# Altium PCB 0.PCB1.PcbDoc (part 12 of 12)
Units mm, origin at the board's own origin, x right, y up, seen from the top; angles counter-clockwise.
Board outline 77 x 72 mm, 6 copper layers (Top Layer, Layer 1, Layer 3, Layer 4, Layer 2, Bottom Layer), stack 1.538 mm thick; 570 components, 490 nets, 3331 pads, 1909 vias.
Unrouted connection lines stored in the file: 2.
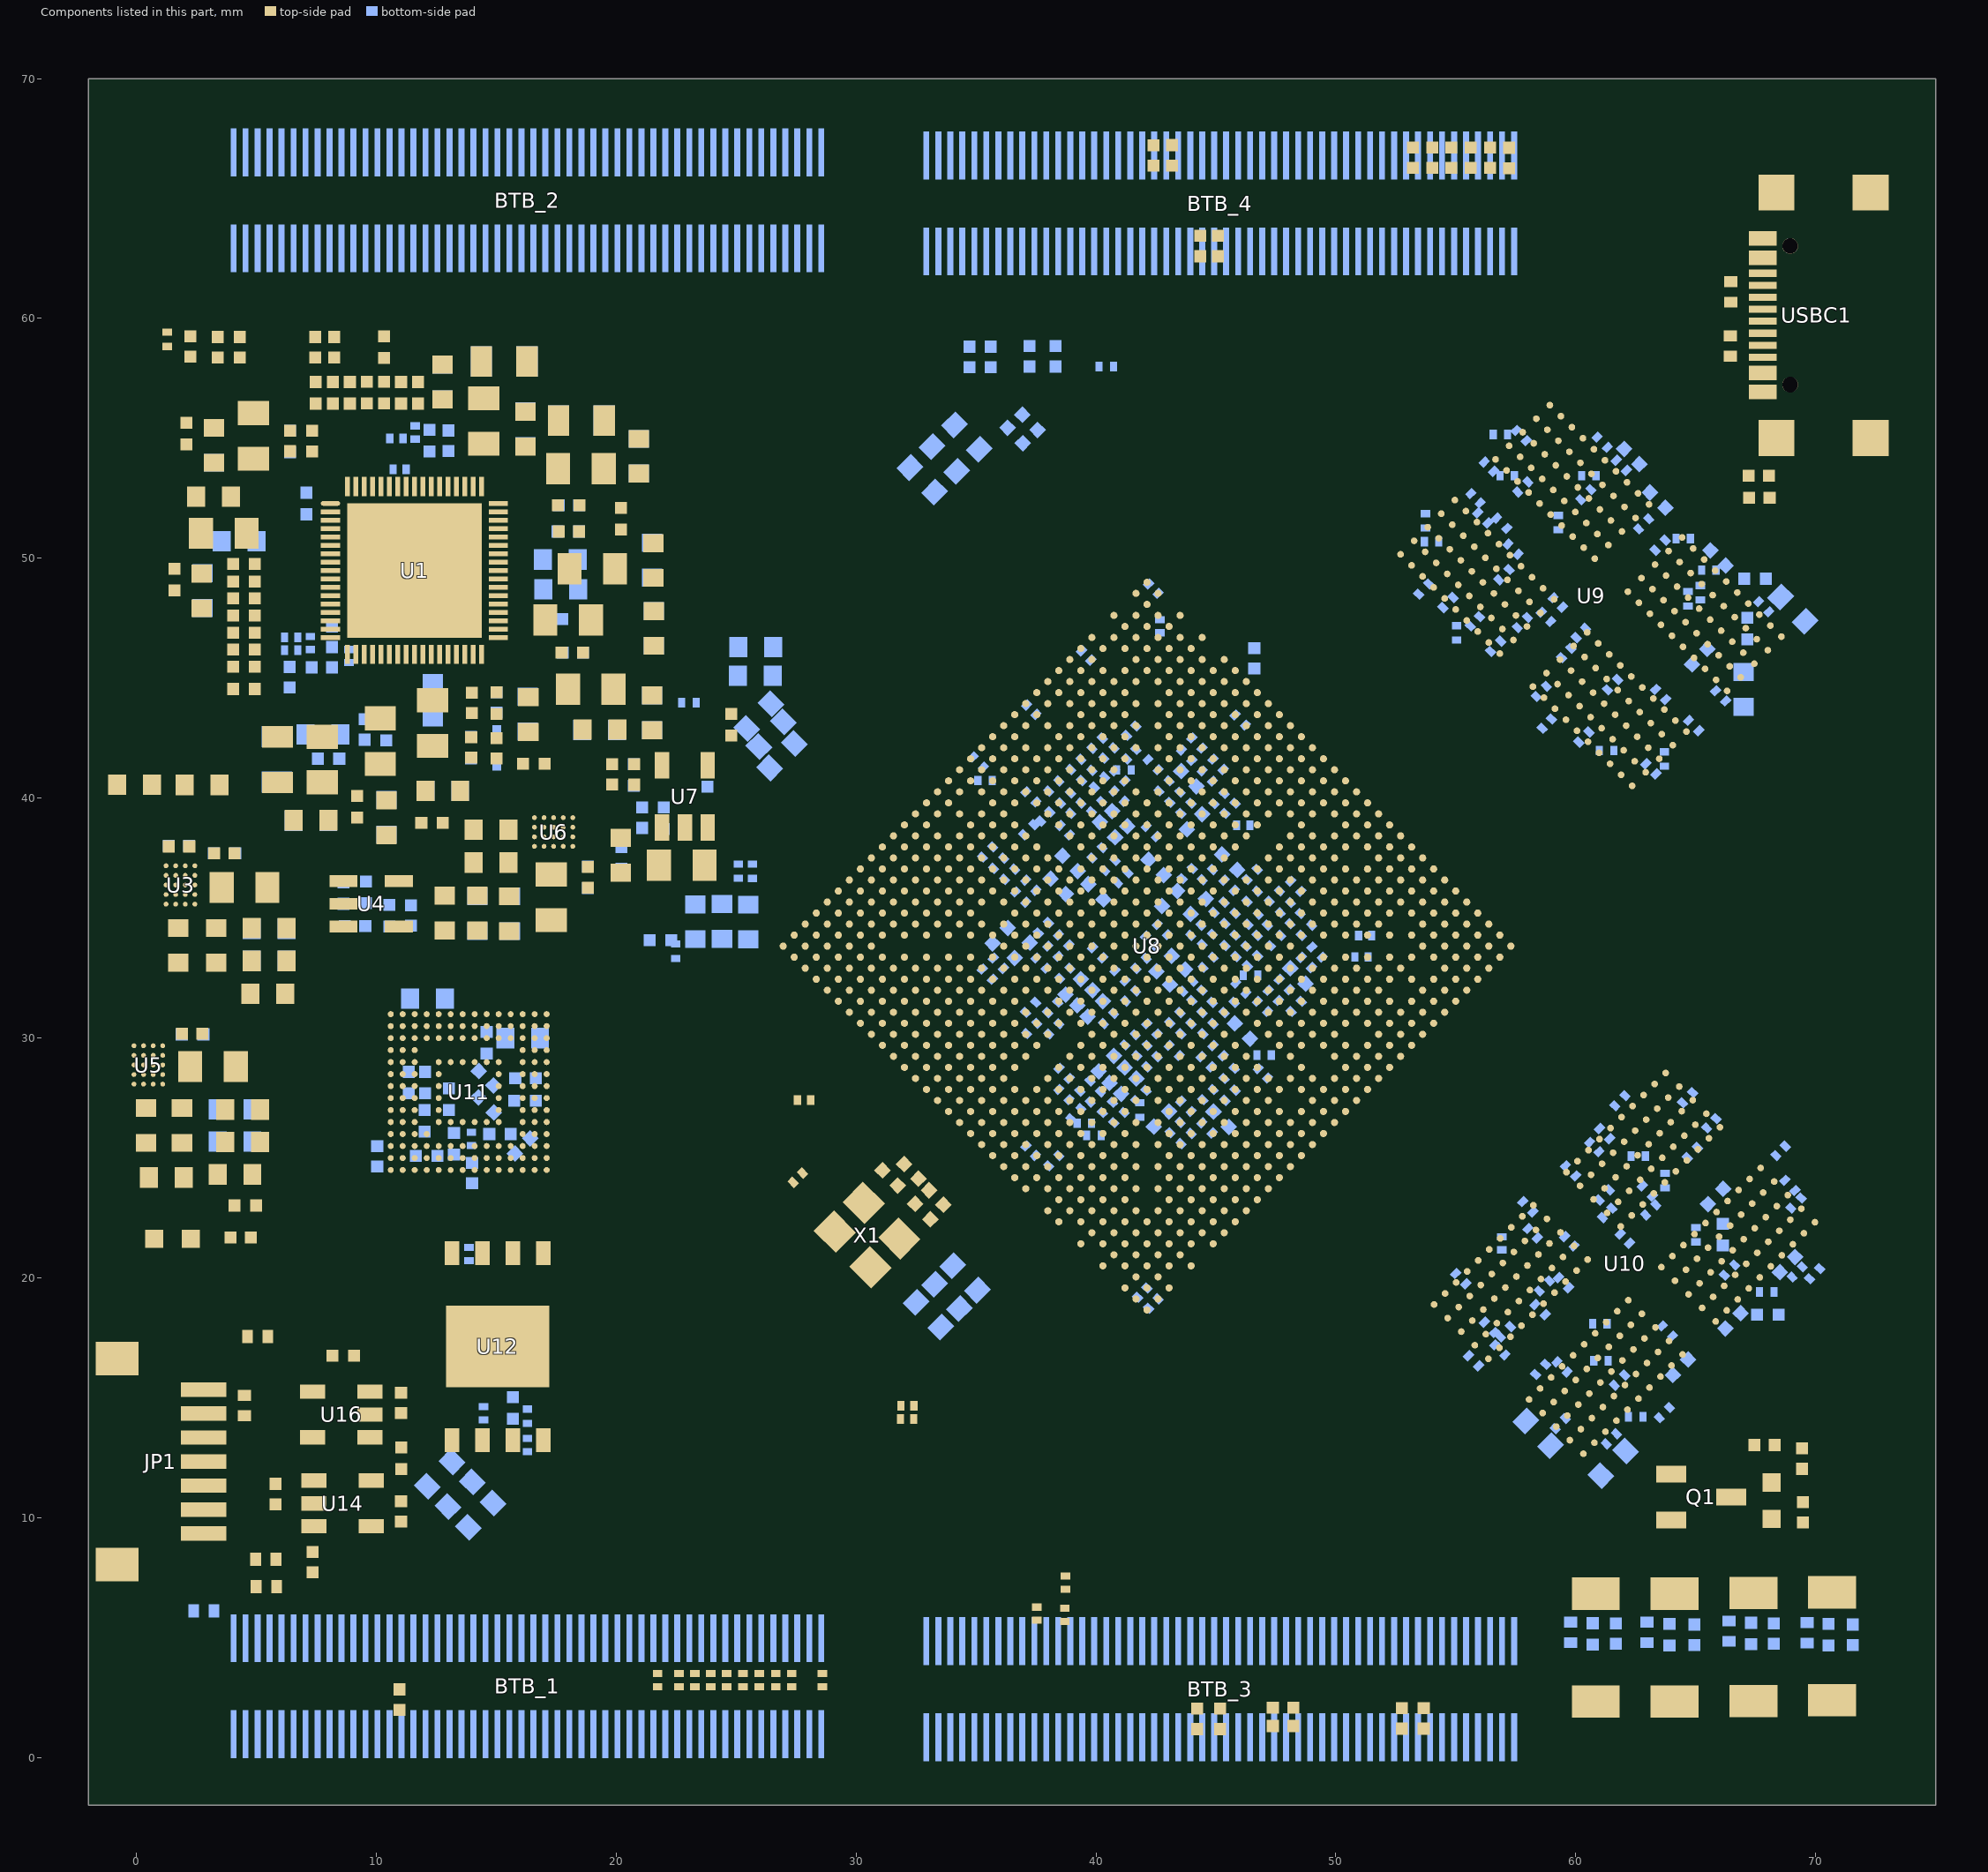
[diagram p16: the components of this part, seen from the top]

## Polygon pours and split planes (outlines as drawn) (continued)
VDD_VDENC_S0 on Layer 4 "VDD_VDENC_S0_L04_P176" (solid, remove dead copper, pour order 176): 20 vertices, not listed, extent 24.51,33.823 45.346,51.208
VCC1V8_PMU_DDR_S3 on Layer 4 "VCC1V8_PMU_DDR_S3_L04_P088" (solid, remove dead copper, pour order 88): 68.958,42.247 68.958,35.743 69.138,35.563 74.718,35.563 75,35.845 75,42.155
VCC1V8_PMU_DDR_S3 on Layer 4 "VCC1V8_PMU_DDR_S3_L04_P087" (solid, remove dead copper, pour order 87): -1.13,13.528 -0.648,13.528 0.662,12.218 68.704,12.218 72.173,15.687 72.173,37.59 75,37.59 75,6.658 68.732,0.389 -1.335,0.389
VDD2_DDR_S3 on Layer 4 "VDD2_DDR_S3_L04_P078" (solid, remove dead copper, pour order 78): 69.334,35.654 72.288,35.654 72.379,35.563 72.173,35.357 72.173,15.741 62.415,5.982 57.307,5.982 56.931,6.358 56.931,8.311 57.685,9.066 58.793,9.066 69.014,19.287 69.014,33.031 69.014,35.687
VDD_VDENC_S0 on Layer 4 "VDD_VDENC_S0_L04_P022" (solid, remove dead copper, pour order 22): 43.816,37.183 42.754,36.12 44.74,34.135 45.345,34.74 45.346,34.74 43.967,36.119 44.422,36.574 44.424,36.574
VDD_CPU_BIG0_S0 on Layer 4 "VDD_CPU_BIG0_S0_L04_P021" (solid, remove dead copper, pour order 21): 43.042,33.354 44.421,31.975 43.506,31.061 43.964,30.604 43.965,30.604 45.35,31.989 43.512,33.827
VCC_1V8_S0 on Layer 4 "VCC_1V8_S0_L04_P019" (solid, remove dead copper, pour order 19): 44.716,42.079 44.42,42.079 43.816,41.475 45.344,39.947 46.098,40.701
AVDD1V8_DDR_PLL_S0 on Layer 4 "AVDD1V8_DDR_PLL_S0_L04_P018" (solid, remove dead copper, pour order 18): 18 vertices, not listed, extent 44.418,26.46 47.186,31.069
VDD_LOGIC_S0 on Layer 4 "VDD_LOGIC_S0_L04_P012" (solid, remove dead copper, pour order 12): 21 vertices, not listed, extent 38.519,28.765 44.885,37.504
VDD2_DDR_S3 on Layer 4 "VDD2_DDR_S3_L04_P007" (solid, remove dead copper, pour order 7): 49.022,37.482 47.651,36.11 47.644,36.11 49.747,34.008 47.645,31.905 47.645,31.524 47.693,31.524 48.588,30.629 52.232,34.273
VDD_DDR_S0 on Layer 4 "VDD_DDR_S0_L04_P006" (solid, remove dead copper, pour order 6): 44.877,37.033 43.972,36.114 45.345,34.741 44.429,33.826 44.429,33.823 44.431,33.823 45.807,32.447 43.964,30.604 44.887,29.681 46.612,31.407 46.612,32.561 45.348,33.825 46.726,35.204
VDDQ_DDR on Layer 4 "VDDQ_DDR_L04_P004" (solid, remove dead copper, pour order 4): 21 vertices, not listed, extent 45.342,32.173 49.931,37.489
AVDD1V8_DDR_PLL_S0 on Layer 4 "AVDD1V8_DDR_PLL_S0_L04_P002" (solid, remove dead copper, pour order 2): 47.18,34.735 47.179,34.735 46.265,33.821 46.895,33.191 46.895,32.157 45.568,30.829 46.253,30.144 46.266,30.144 49.019,32.896
VCC1V8_PMU_DDR_S3 on Layer 4 "VCC1V8_PMU_DDR_S3_L04_P027" (solid, remove dead copper, pour order 27): 37.961,30.581 36.79,29.41 38.401,27.798 38.913,28.31 39.578,28.975
VCC_1V8_S0 on Layer 4 "VCC_1V8_S0_L04_P020" (solid, remove dead copper, pour order 20): 36.769,32.601 35.739,32.601 35.739,32.061 37.523,30.277 38.308,31.062
AVDD1V8_DDR_PLL_S0 on Layer 4 "AVDD1V8_DDR_PLL_S0_L04_P017" (solid, remove dead copper, pour order 17): 17 vertices, not listed, extent 40.289,26.007 44.932,28.31
VDD_CPU_BIG1_S0 on Layer 4 "VDD_CPU_BIG1_S0_L04_P016" (solid, remove dead copper, pour order 16): 41.358,29.835 43.039,28.154 43.04,27.837 42.426,27.223 40.587,29.062
VDD_LOGIC_S0 on Layer 4 "VDD_LOGIC_S0_L04_P032" (solid, remove dead copper, pour order 32): 23.118,54.544 21.77,54.544 19.496,56.818 15.519,56.818 14.889,56.188 13.916,56.188 13.583,56.52 13.591,56.528 13.591,59.807 14.17,60.386 23.388,60.386 25.252,58.522 25.252,54.493
VDD_VDENC_S0 on Layer 3 "VDD_VDENC_S0_L03_P047" (solid, remove dead copper, pour order 47): 26.979,49.574 24.262,52.29 0.058,52.29 0.058,40.348 0.291,40.115 2.052,40.115 2.285,40.348 2.189,40.445 2.189,47.723 4.039,49.574
VDDQ_DDR on Layer 3 "VDDQ_DDR_L03_P182" (solid, remove dead copper, pour order 182): 25 vertices, not listed, extent -1.512,34.016 54.736,69.502
VDD_NPU_S0 on Layer 3 "VDD_NPU_S0_L03_P092" (solid, remove dead copper, pour order 92): 13.65,32.464 37.556,32.464 38.911,33.818 38.911,34.818 38.07,35.659 37.2,35.659 34.439,38.42 23.794,38.42 21.81,36.437 18.477,36.437 17.83,37.083 13.275,37.083 11.978,35.786 11.978,33.998
VDDQ_DDR on Layer 3 "VDDQ_DDR_L03_P066" (solid, remove dead copper, pour order 66): 51 vertices, not listed, extent 51.98,-1.549 74.782,31.12
VDD_GPU_S0 on Layer 3 "VDD_GPU_S0_L03_P178" (solid, remove dead copper, pour order 178): 19 vertices, not listed, extent 18.774,36.632 50.228,59.568
VDD2_DDR_S3 on Layer 3 "VDD2_DDR_S3_L03_P037" (solid, remove dead copper, pour order 37): 39 vertices, not listed, extent 1.396,8.629 52.512,45.098
VDD_CPU_BIG0_S0 on Layer 3 "VDD_CPU_BIG0_S0_L03_P069" (solid, remove dead copper, pour order 69): 38 vertices, not listed, extent -1.355,4.646 54.498,38.189
VCC1V8_PMU_DDR_S3 on Layer 3 "VCC1V8_PMU_DDR_S3_L03_P033" (solid, remove dead copper, pour order 33): 22 vertices, not listed, extent 5.935,22.615 40.751,42.761
VDD_DDR_S0 on Layer 3 "VDD_DDR_S0_L03_P070" (solid, remove dead copper, pour order 70): 23 vertices, not listed, extent -1.55,-1.234 58.335,38.555
VDDQ_DDR on Layer 3 "VDDQ_DDR_L03_P061" (solid, remove dead copper, pour order 61): 80 vertices, not listed, extent 50.728,40.069 74.779,69.513
VCC1V8_PMU_DDR_S3 on Layer 3 "VCC1V8_PMU_DDR_S3_L03_P059" (solid, remove dead copper, pour order 59): 84 vertices, not listed, extent 54.007,41.413 67.873,54.727
VDD_DDR_S0 on Layer 3 "VDD_DDR_S0_L03_P067" (solid, remove dead copper, pour order 67): 18 vertices, not listed, extent 44.882,32.368 55.577,38.752
VDD_CPU_BIG0_S0 on Layer 3 "VDD_CPU_BIG0_S0_L03_P068" (solid, remove dead copper, pour order 68): 42.035,32.346 46.634,27.747 54.505,27.747 54.505,32.5 45.752,32.5 43.97,34.282
VDD_CPU_BIG1_S0 on Layer 3 "VDD_CPU_BIG1_S0_L03_P035" (solid, remove dead copper, pour order 35): 18 vertices, not listed, extent 3.896,17.326 46.251,30.603
VDD_GPU_S0 on Layer 3 "VDD_GPU_S0_L03_P186" (solid, remove dead copper, pour order 186): 17.914,59.561 17.914,55.517 18.153,55.278 20.553,55.278 20.931,55.657 20.931,59.586
VCC1V8_PMU_DDR_S3 on Layer 3 "VCC1V8_PMU_DDR_S3_L03_P063" (solid, remove dead copper, pour order 63): 119 vertices, not listed, extent 52.694,12.822 69.321,27.521
AVDD1V8_DDR_PLL_S0 on Layer 3 "AVDD1V8_DDR_PLL_S0_L03_P026" (solid, remove dead copper, pour order 26): 40.777,41.121 38.265,38.609 37.161,38.609 37.027,38.475 37.072,38.43 37.072,37.496 38.907,37.496 41.556,40.145 41.678,40.145
VDD2_DDR_S3 on Layer 3 "VDD2_DDR_S3_L03_P054" (solid, remove dead copper, pour order 54): 37 vertices, not listed, extent 57.338,15.398 67.231,24.892
VDD2_DDR_S3 on Layer 3 "VDD2_DDR_S3_L03_P055" (solid, remove dead copper, pour order 55): 26 vertices, not listed, extent 54.774,42.756 66.951,53.19
VCC1V8_PMU_DDR_S3 on Layer 3 "VCC1V8_PMU_DDR_S3_L03_P085" (solid, remove dead copper, pour order 85): 31 vertices, not listed, extent 58.191,23.027 72.989,44.423
VDD2_DDR_S3 on Layer 3 "VDD2_DDR_S3_L03_P072" (solid, remove dead copper, pour order 72): 23 vertices, not listed, extent 54.729,23.239 61.897,46.599
VDD_DDR_S0 on Layer 3 "VDD_DDR_S0_L03_P184" (solid, remove dead copper, pour order 184): 46.819,32.388 46.893,32.388 47.142,32.637 48.676,32.637 49.092,33.053 49.064,33.081 49.064,33.328 47.35,33.328 46.999,32.977 46.509,32.977
VDD_CPU_BIG0_S0 on Layer 3 "VDD_CPU_BIG0_S0_L03_P183" (solid, remove dead copper, pour order 183): 45.359,32.479 45.404,32.434 45.658,32.434 45.752,32.34 45.752,31.758 45.653,31.659 45.153,31.659 45.026,31.786 45.026,32.383
VDD_NPU_S0 on Layer 3 "VDD_NPU_S0_L03_P181" (solid, remove dead copper, pour order 181): 36.156,36.46 36.446,36.17 36.784,36.17 37.304,35.649 37.304,34.882 36.152,34.882
no net on Layer 3 "NONET_L03_P034" (solid, remove dead copper, pour order 34): 39.832,29.229 38.505,30.557 37.937,30.557 36.79,29.41 38.661,27.539 38.8,27.539
VDDQ_DDR on Layer 3 "VDDQ_DDR_L03_P086" (solid, remove dead copper, pour order 86): 68.927,40.069 72.989,36.007 72.971,35.99 72.971,30.661 73.885,29.746 74.782,29.746 74.782,40.283 72.991,42.035
VDD2_DDR_S3 on Layer 3 "VDD2_DDR_S3_L03_P084" (solid, remove dead copper, pour order 84): 71.168,33.551 70.667,33.051 60.987,33.051 60.421,33.617 60.421,35.187 61.203,35.969 61.414,35.758 71.264,35.758
VCC1V8_PMU_DDR_S3 on Layer 3 "VCC1V8_PMU_DDR_S3_L03_P065" (solid, remove dead copper, pour order 65): 40 vertices, not listed, extent 52.346,51.278 58.348,56.985
VDD2_DDR_S3 on Layer 3 "VDD2_DDR_S3_L03_P064" (solid, remove dead copper, pour order 64): 55.862,53.033 55.851,53.043 55.188,53.043 54.033,51.887 53.72,51.887 53.542,52.065 53.542,53.025 56.09,55.573 56.59,55.573 56.855,55.309 56.85,55.304 56.85,54.935 56.171,54.257 56.171,53.706 56.171,53.295
no net on Bottom Layer "NONET_L06_P195" (solid, remove dead copper, pour order 195): 24.459,10.521 24.459,5.974 24.858,5.576 25.509,5.576 25.509,10.054 25.021,10.541
GND on Bottom Layer "GND_L06_P194" (solid, remove dead copper, pour order 194): -2,70 75,70 75,-2.001 -1.992,-2.001 -1.997,-1.996
VDD_CPU_LIT_S0 on Bottom Layer "VDD_CPU_LIT_S0_L06_P179" (solid, remove dead copper, pour order 179): 29 vertices, not listed, extent 19.181,30.397 29.341,45.215
VCC_1V1_NLDO_S3 on Bottom Layer "VCC_1V1_NLDO_S3_L06_P090" (solid, remove dead copper, pour order 90): 32 vertices, not listed, extent 4.756,36.058 23.182,49.768
VCC_2V0_PLDO_S3 on Bottom Layer "VCC_2V0_PLDO_S3_L06_P089" (solid, remove dead copper, pour order 89): 25 vertices, not listed, extent 9.567,46.076 22.414,56.8
VCC4V0_SYS on Bottom Layer "VCC4V0_SYS_L06_P141" (solid, remove dead copper, pour order 141): 8.699,41.392 8.699,41.41 9.062,41.773 9.006,41.829 9.006,44.082 8.849,44.24 8.823,44.214 8.115,44.214 8.115,44.212 7.749,43.846 7.749,41.684 8.028,41.405
GND on Bottom Layer "GND_L06_P163" (solid, remove dead copper, pour order 163): 17 vertices, not listed, extent 21.612,33.795 26.215,36.945
GND on Bottom Layer "GND_L06_P157" (solid, remove dead copper, pour order 157): 35.105,20.064 34.907,20.064 32.849,18.006 32.849,17.775 33.421,17.204 33.728,17.204 35.879,19.355
VDD_CPU_BIG1_S0 on Bottom Layer "VDD_CPU_BIG1_S0_L06_P156" (solid, remove dead copper, pour order 156): 34.068,21.067 33.753,21.067 31.709,19.022 31.709,18.702 32.278,18.133 32.28,18.136 32.57,18.136 34.884,20.45 34.261,21.072 34.063,21.072
VDD_NPU_S0 on Bottom Layer "VDD_NPU_S0_L06_P149" (solid, remove dead copper, pour order 149): 22.877,34.506 22.905,34.506 23.027,34.628 25.981,34.628 26.202,34.407 26.202,33.594 25.981,33.373 22.895,33.373 22.895,33.45 22.875,33.47
VCC1V8_PMU_DDR_S3 on Bottom Layer "VCC1V8_PMU_DDR_S3_L06_P077" (solid, remove dead copper, pour order 77): 19 vertices, not listed, extent -1.41,6.559 10.228,33.5
VDD_CPU_BIG0_S0 on Bottom Layer "VDD_CPU_BIG0_S0_L06_P075" (solid, remove dead copper, pour order 75): -0.971,35.355 -0.681,35.644 3.586,35.644 4.968,37.026 5.534,37.026 7.106,35.454 7.106,31.471 6.761,31.126 -1.045,31.126
VCC1V8_PMU_DDR_S3 on Bottom Layer "VCC1V8_PMU_DDR_S3_L06_P154" (solid, remove dead copper, pour order 154): 9.86,41.984 9.669,41.794 9.672,41.791 9.672,41.27 9.578,41.27 8.938,40.63 8.965,40.602 8.965,39.67 9.199,39.436 10.985,39.436 11.13,39.581 11.13,42.017
VCC4V0_SYS on Bottom Layer "VCC4V0_SYS_L06_P091" (solid, remove dead copper, pour order 91): 4.099,3.866 4.188,3.955 6.377,3.955 6.423,3.909 6.4,3.887 6.4,2.159 6.281,2.04 4.132,2.04 4.132,2.045 4.096,2.081
GND on Bottom Layer "GND_L06_P143" (solid, remove dead copper, pour order 143): 18.023,50.361 18.336,50.673 19.324,50.673 19.677,50.32 19.677,48.118 19.59,48.032 18.049,48.032
GND on Bottom Layer "GND_L06_P165" (solid, remove dead copper, pour order 165): 13.474,37.412 13.096,37.412 12.209,36.526 12.209,35.535 12.361,35.383 16.055,35.383 16.276,35.604 16.276,37.442
VDD_VDENC_S0 on Bottom Layer "VDD_VDENC_S0_L06_P048" (solid, remove dead copper, pour order 48): 0.063,41.628 0.074,41.64 8.474,41.64 8.874,41.24 8.874,38.369 8.7,38.195 8.684,38.212 3.151,38.212 2.776,38.588 2.776,39.297 0.175,39.297 0.048,39.424
GND on Bottom Layer "GND_L06_P171" (solid, remove dead copper, pour order 171): 21.165,46.719 21.168,46.721 24.609,46.721 24.609,46.617 25.1,46.127 25.1,43.389 24.914,43.203 24.879,43.239 23.357,43.239 23.357,43.381 23.121,43.617 23.121,45.375 23.07,45.375 22.582,45.863 21.152,45.863
VDDQ_DDR on Bottom Layer "VDDQ_DDR_L06_P155" (solid, remove dead copper, pour order 155): 5.138,56.388 5.587,56.388 6.283,55.692 6.682,55.692 6.682,55.677 6.753,55.606 6.753,54.933 6.646,54.826 5.206,54.826 4.978,55.055 4.978,56.383
VDD_LOGIC_S0 on Bottom Layer "VDD_LOGIC_S0_L06_P146" (solid, remove dead copper, pour order 146): 12.344,56.993 12.344,56.577 11.864,56.097 11.874,56.087 11.874,55.111 11.983,55.002 13.352,55.002 13.469,55.118 13.469,56.82 13.286,57.003
VDD_GPU_S0 on Bottom Layer "VDD_GPU_S0_L06_P148" (solid, remove dead copper, pour order 148): 19.077,56.365 18.935,56.365 18.813,56.244 18.864,56.193 18.864,54.58 19.265,54.179 21.353,54.179 21.569,54.394 21.569,55.268 21.554,55.283 21.551,55.281 19.849,55.281 19.849,55.377 19.722,55.504 19.722,56.358
GND on Bottom Layer "GND_L06_P166" (solid, remove dead copper, pour order 166): 5.214,43.018 5.214,42.154 5.26,42.108 6.603,42.108 7.332,41.379 7.815,41.379 7.815,41.837 7.84,41.862 7.736,41.966 7.736,43 7.502,43.234 5.272,43.234
VDD_NPU_S0 on Bottom Layer "VDD_NPU_S0_L06_P164" (solid, remove dead copper, pour order 164): 12.323,34.956 12.191,34.824 12.191,33.988 12.402,33.777 15.943,33.777 16.133,33.968 16.133,34.984
GND on Bottom Layer "GND_L06_P162" (solid, remove dead copper, pour order 162): 1.899,15.604 1.899,15.571 1.79,15.461 1.79,14.011 1.897,13.904 3.769,13.904 3.941,14.077 3.941,15.601
VCC4V0_SYS on Bottom Layer "VCC4V0_SYS_L06_P161" (solid, remove dead copper, pour order 161): 1.843,13.541 1.843,12.053 1.978,11.918 3.746,11.918 3.987,12.159 3.987,13.556
GND on Bottom Layer "GND_L06_P160" (solid, remove dead copper, pour order 160): 8.391,35.84 8.391,35.355 8.808,34.938 9.181,34.938 9.181,34.458 9.237,34.402 9.829,34.402 9.872,34.445 9.872,35.134 9.989,35.25 10.815,35.25 10.898,35.334 10.898,35.865
GND on Bottom Layer "GND_L06_P159" (solid, remove dead copper, pour order 159): 3.022,27.44 3.022,25.268 3.063,25.228 3.819,25.228 3.934,25.342 3.934,27.427
VDD_CPU_BIG1_S0 on Bottom Layer "VDD_CPU_BIG1_S0_L06_P153" (solid, remove dead copper, pour order 153): 4.487,27.531 4.487,27.526 4.3,27.338 4.3,23.77 4.406,23.663 5.547,23.663 5.704,23.82 5.679,23.846 5.679,27.524
GND on Bottom Layer "GND_L06_P152" (solid, remove dead copper, pour order 152): 12.087,11.855 14.399,9.543 14.399,9.523 14.35,9.523 13.855,9.028 11.559,11.324 11.559,11.331
VDD_CPU_BIG0_S0 on Bottom Layer "VDD_CPU_BIG0_S0_L06_P151" (solid, remove dead copper, pour order 151): 13.103,12.898 13.103,12.891 15.392,10.602 14.876,10.087 14.858,10.087 14.858,10.097 12.588,12.368
VDD_LOGIC_S0 on Bottom Layer "VDD_LOGIC_S0_L06_P147" (solid, remove dead copper, pour order 147): 13.957,58.837 13.936,58.817 13.936,56.553 14.282,56.208 14.36,56.287 15.135,56.287 15.298,56.449 15.298,58.839
VCC4V0_SYS on Bottom Layer "VCC4V0_SYS_L06_P144" (solid, remove dead copper, pour order 144): 4.642,51.131 5.854,51.131 6.088,50.897 6.088,50.249 5.986,50.148 4.66,50.148
VCC4V0_SYS on Bottom Layer "VCC4V0_SYS_L06_P142" (solid, remove dead copper, pour order 142): 16.583,48.276 16.585,48.273 17.373,48.273 17.657,48.558 17.64,48.575 17.64,50.605 17.513,50.732 16.654,50.732 16.54,50.617
GND on Top Layer "GND_L01_P192" (solid, remove dead copper, pour order 192): -2,70 75,70 75,-2 -2,-2
GND on Top Layer "GND_L01_P174" (solid, remove dead copper, pour order 174): 17 vertices, not listed, extent 1.307,45.057 4.587,50.066
NetL2_1 on Top Layer "NETL2_1_L01_P098" (solid, remove dead copper, pour order 98): 18 vertices, not listed, extent 14.681,51.839 18.341,54.367
NetL4_1 on Top Layer "NETL4_1_L01_P102" (solid, remove dead copper, pour order 102): 14.686,47.14 14.691,47.135 15.531,47.135 17.482,45.184 17.485,45.187 18.501,45.187 18.501,43.894 18.488,43.881 17.401,43.881 14.683,46.599
GND on Top Layer "GND_L01_P169" (solid, remove dead copper, pour order 169): 15.867,43.475 15.867,43.434 15.702,43.269 15.712,43.259 15.712,42.144 15.945,41.91 18.849,41.91 19.11,42.172 19.098,42.185 19.098,43.32 19.011,43.32 18.785,43.546
GND on Top Layer "GND_L01_P127" (solid, remove dead copper, pour order 127): 1.089,33.434 1.089,33.45 1.287,33.648 3.977,33.648 4.305,33.32 4.305,32.525 4.355,32.474 5.28,32.474 5.364,32.39 5.364,31.382 5.252,31.27 5.239,31.283 1.373,31.283 1.373,31.288 1.117,31.545
GND on Top Layer "GND_L01_P173" (solid, remove dead copper, pour order 173): 2.059,52.144 3.149,52.144 3.428,52.423 3.428,53.01 3.792,53.01 4.162,53.381 4.162,54.547 3.946,54.763 2.806,54.763 2.367,55.202 1.866,55.202 1.803,55.139 1.803,54.394 2.044,54.153 2.044,52.152
VDD_NPU_S0 on Top Layer "VDD_NPU_S0_L01_P133" (solid, remove dead copper, pour order 133): 18.734,38.138 19.087,37.785 19.087,36.736 19.024,36.673 18.602,36.673 18.526,36.749 18.526,37.422 18.038,37.91 18.038,38.138
NetL13_1 on Top Layer "NETL13_1_L01_P130" (solid, remove dead copper, pour order 130): 16.522,38.492 16.461,38.431 16.461,36.307 16.616,36.152 17.998,36.152 18.12,36.274 18.12,37.351 17.871,37.6 17.307,37.6 17.307,37.641 17.18,37.768 17.18,38.497
VDD_DDR_S0 on Top Layer "VDD_DDR_S0_L01_P114" (solid, remove dead copper, pour order 114): 18 vertices, not listed, extent 18.203,48.806 21.965,51.451
GND on Top Layer "GND_L01_P131" (solid, remove dead copper, pour order 131): 26 vertices, not listed, extent 17.147,36.757 18.526,39.368
VDD_NPU_S0 on Top Layer "VDD_NPU_S0_L01_P124" (solid, remove dead copper, pour order 124): 18.549,36.561 18.536,36.561 17.386,35.41 17.378,35.418 16.316,35.418 15.958,35.06 12.448,35.06 12.27,34.882 12.27,34.024 12.44,33.853 17.932,33.853 19.204,35.126 19.204,36.543
GND on Top Layer "GND_L01_P170" (solid, remove dead copper, pour order 170): 22 vertices, not listed, extent 4.52,38.634 6.954,42.987
GND on Top Layer "GND_L01_P168" (solid, remove dead copper, pour order 168): 15.818,58.827 15.841,58.85 16.723,58.85 16.723,58.829 18.457,57.094 18.457,55.24 18.305,55.088 16.42,55.088 15.755,55.753 15.785,55.784 15.785,58.85
VDD2_DDR_S3 on Top Layer "VDD2_DDR_S3_L01_P082" (solid, remove dead copper, pour order 82): 17 vertices, not listed, extent 31.432,-1.742 59.806,10.849
GND on Top Layer "GND_L01_P189" (solid, remove dead copper, pour order 189): 163 vertices, not listed, extent 50.863,37.962 63.707,52.282
GND on Top Layer "GND_L01_P191" (solid, remove dead copper, pour order 191): 192 vertices, not listed, extent 51.055,17.46 65.165,29.632
VDD_GPU_S0 on Top Layer "VDD_GPU_S0_L01_P113" (solid, remove dead copper, pour order 113): 26 vertices, not listed, extent 18.229,51.964 21.381,56.378
NetL14_1 on Top Layer "NETL14_1_L01_P145" (solid, remove dead copper, pour order 145): 23.499,39.309 23.179,38.989 23.179,36.373 23.306,36.246 24.416,36.246 24.528,36.358 24.495,36.391 24.495,39.314
VDD_VDENC_S0 on Top Layer "VDD_VDENC_S0_L01_P119" (solid, remove dead copper, pour order 119): 5.239,41.105 5.719,41.585 8.536,41.585 8.691,41.43 8.691,38.674 8.574,38.558 7.604,38.558 7.322,38.839 7.322,39.65 7.213,39.759 5.242,39.759
GND on Top Layer "GND_L01_P175" (solid, remove dead copper, pour order 175): 8.793,39.454 11.206,39.454 11.358,39.302 11.358,37.9 11.203,37.745 9.524,37.745 9.524,37.752 8.78,38.497
VDD2_DDR_S3 on Top Layer "VDD2_DDR_S3_L01_P117" (solid, remove dead copper, pour order 117): 26 vertices, not listed, extent 11.399,38.207 14.282,46.391
GND on Top Layer "GND_L01_P172" (solid, remove dead copper, pour order 172): 13.101,40.722 13.865,40.722 14.505,41.362 15.572,41.362 15.75,41.184 15.727,41.161 15.727,40.734 14.818,39.825 13.106,39.825
VCC4V0_SYS on Top Layer "VCC4V0_SYS_L01_P125" (solid, remove dead copper, pour order 125): 1.178,36.081 1.767,36.081 1.838,36.01 1.838,35.4 1.998,35.24 3.781,35.24 4.018,35.004 4.018,34.008 3.842,33.833 1.252,33.833 1.003,34.082 1.003,35.954
NetL5_1 on Top Layer "NETL5_1_L01_P139" (solid, remove dead copper, pour order 139): 4.236,54.656 5.539,54.656 5.539,53.665 5.732,53.472 8.8,53.472 8.897,53.376 8.887,53.366 8.887,52.596 8.709,52.596 8.699,52.586 8.513,52.771 4.935,52.771 4.236,53.47
VCC_3V3_S3 on Top Layer "VCC_3V3_S3_L01_P138" (solid, remove dead copper, pour order 138): 3.187,51.689 3.644,51.232 3.644,49.19 3.446,48.992 1.584,48.992 1.584,49.05 1.33,49.304 1.338,49.312 1.338,50.833 2.194,51.689
VDD_CPU_BIG1_S0 on Top Layer "VDD_CPU_BIG1_S0_L01_P137" (solid, remove dead copper, pour order 137): 23 vertices, not listed, extent 2.43,22.771 5.737,30.491
GND on Top Layer "GND_L01_P136" (solid, remove dead copper, pour order 136): 21 vertices, not listed, extent -1.436,24.941 1.274,29.396
NetL12_1 on Top Layer "NETL12_1_L01_P135" (solid, remove dead copper, pour order 135): 0.589,28.565 0.695,28.672 0.954,28.672 1.747,29.464 2.748,29.464 2.748,29.462 2.948,29.261 2.948,28.105 2.77,27.928 0.675,27.928 0.566,28.037
VCC4V0_SYS on Top Layer "VCC4V0_SYS_L01_P134" (solid, remove dead copper, pour order 134): -0.229,28.499 -0.229,28.542 -0.163,28.608 -0.161,28.606 0.441,28.606 0.54,28.507 0.54,27.699 0.599,27.699 0.675,27.623 2.316,27.623 2.463,27.476 2.463,26.612 2.283,26.432 -0.069,26.432 -0.224,26.587
VDD_CPU_BIG0_S0 on Top Layer "VDD_CPU_BIG0_S0_L01_P132" (solid, remove dead copper, pour order 132): 2.326,37.102 2.369,37.059 3.093,37.059 3.497,37.463 3.497,37.948 3.002,37.948 2.994,37.956 2.323,37.285 2.323,37.125
GND on Top Layer "GND_L01_P129" (solid, remove dead copper, pour order 129): 18 vertices, not listed, extent 0.413,35.771 2.522,36.884
NetL11_1 on Top Layer "NETL11_1_L01_P128" (solid, remove dead copper, pour order 128): 1.935,35.547 1.993,35.489 3.924,35.489 4.061,35.626 4.061,36.973 3.835,37.199 2.963,37.199 2.636,36.871 2.636,36.198 2.577,36.139 1.918,36.139
VDD_CPU_BIG0_S0 on Top Layer "VDD_CPU_BIG0_S0_L01_P126" (solid, remove dead copper, pour order 126): 3.842,37.961 5.42,37.961 6.718,36.663 6.718,31.443 6.654,31.38 5.648,31.38 5.493,31.534 5.501,31.542 5.501,35.103 4.759,35.845 4.759,37.056 4.34,37.476 3.84,37.476
GND on Top Layer "GND_L01_P123" (solid, remove dead copper, pour order 123): 13.698,39.073 13.698,38.301 12.214,36.818 12.214,35.548 12.422,35.339 15.94,35.339 16.189,35.588 16.189,36.353 15.95,36.592 14.818,36.592 14.66,36.749 14.696,36.785 14.696,39.083
VCC4V0_SYS on Top Layer "VCC4V0_SYS_L01_P122" (solid, remove dead copper, pour order 122): 15.135,39.106 15.514,39.485 17.073,39.485 17.205,39.353 17.205,38.573 17.132,38.499 16.497,38.499 16.271,38.273 16.271,36.876 16.08,36.686 14.968,36.686 14.807,36.846 14.807,38.842
VCC_1V1_NLDO_S3 on Top Layer "VCC_1V1_NLDO_S3_L01_P121" (solid, remove dead copper, pour order 121): 17 vertices, not listed, extent 19.656,36.185 22.298,40.818
VDDQ_DDR on Top Layer "VDDQ_DDR_L01_P120" (solid, remove dead copper, pour order 120): 29 vertices, not listed, extent 1.82,52.586 9.25,56.63
VCC1V8_PMU_DDR_S3 on Top Layer "VCC1V8_PMU_DDR_S3_L01_P118" (solid, remove dead copper, pour order 118): 8.836,42.074 8.836,39.774 9.156,39.454 11.028,39.454 11.378,39.805 11.378,41.974 11.069,42.284 9.046,42.284
VDD_CPU_LIT_S0 on Top Layer "VDD_CPU_LIT_S0_L01_P116" (solid, remove dead copper, pour order 116): 17 vertices, not listed, extent 18.376,42.439 21.919,46.317
VDD_LOGIC_S0 on Top Layer "VDD_LOGIC_S0_L01_P112" (solid, remove dead copper, pour order 112): 12.331,57 12.892,57 13.939,58.047 13.939,58.832 14.828,58.832 15.133,58.527 15.133,56.172 15.138,56.167 13.268,56.167 13.179,56.256 12.328,56.256
VCC4V0_SYS on Top Layer "VCC4V0_SYS_L01_P111" (solid, remove dead copper, pour order 111): 8.485,52.398 8.483,52.398 8.036,52.845 4.457,52.845 4.457,52.85 4.327,52.98 3.571,52.98 3.571,52.134 3.576,52.129 3.583,52.136 7.401,52.136 7.454,52.19 8.491,52.19
NetL7_1 on Top Layer "NETL7_1_L01_P110" (solid, remove dead copper, pour order 110): 8.491,50.635 7.292,50.635 6.227,51.7 6.222,51.694 4.089,51.694 4.089,50.399 4.091,50.402 5.349,50.402 5.613,50.666 6.563,50.666 6.809,50.419 6.827,50.437 8.496,50.437
VCC4V0_SYS on Top Layer "VCC4V0_SYS_L01_P109" (solid, remove dead copper, pour order 109): 8.493,50.287 6.956,50.287 6.573,50.671 5.603,50.671 5.554,50.623 5.559,50.617 5.559,50.125 5.666,50.018 7.038,50.018 7.106,50.087 8.485,50.087
VCC4V0_SYS on Top Layer "VCC4V0_SYS_L01_P108" (solid, remove dead copper, pour order 108): 9.743,46.391 9.743,45.799 8.32,44.377 8.32,43.503 8.424,43.399 8.696,43.399 8.859,43.561 8.856,43.564 8.856,43.963 10.296,45.403 10.296,46.386
NetL8_1 on Top Layer "NETL8_1_L01_P107" (solid, remove dead copper, pour order 107): 10.441,46.391 10.441,45.649 7.843,43.051 7.101,43.051 7.101,42.07 7.116,42.055 8.463,42.055 9.524,43.117 9.524,43.785 9.588,43.785 10.647,44.844 10.634,44.857 10.634,46.399
NetL9_1 on Top Layer "NETL9_1_L01_P106" (solid, remove dead copper, pour order 106): 11.472,46.391 11.485,46.378 11.485,44.958 10.345,43.818 10.329,43.833 9.512,43.833 9.512,42.843 9.517,42.837 10.944,42.837 11.706,43.599 11.696,43.61 11.696,46.391
VCC4V0_SYS on Top Layer "VCC4V0_SYS_L01_P105" (solid, remove dead copper, pour order 105): 11.841,46.388 12.389,46.388 12.394,46.383 12.394,45.062 12.273,44.941 11.975,44.941 11.975,44.951 11.841,45.085
NetL3_1 on Top Layer "NETL3_1_L01_P104" (solid, remove dead copper, pour order 104): 12.537,46.391 12.539,46.388 12.539,45.426 11.696,44.582 11.699,44.58 11.699,43.582 12.994,43.582 13.002,43.574 13.004,43.577 13.004,44.61 12.737,44.877 12.737,46.391
VCC4V0_SYS on Top Layer "VCC4V0_SYS_L01_P103" (solid, remove dead copper, pour order 103): 13.936,46.396 13.944,46.388 15.089,46.388 16.916,44.562 16.916,43.762 16.862,43.709 15.816,43.709 13.936,45.588
NetL10_1 on Top Layer "NETL10_1_L01_P101" (solid, remove dead copper, pour order 101): 14.691,49.241 15.773,49.241 15.844,49.312 17.284,49.312 17.556,49.04 17.553,49.038 17.553,46.787 16.555,46.787 16.552,46.785 16.55,46.787 16.55,48.606 16.113,49.043 14.691,49.043
VCC4V0_SYS on Top Layer "VCC4V0_SYS_L01_P100" (solid, remove dead copper, pour order 100): 14.693,49.939 17.447,49.939 17.541,49.845 17.541,49.386 15.493,49.386 15.486,49.393 15.478,49.386 14.693,49.386
NetL6_1 on Top Layer "NETL6_1_L01_P097" (solid, remove dead copper, pour order 97): 13.24,53.391 13.245,53.396 13.245,54.669 13.85,55.273 13.855,55.268 15.285,55.268 15.285,53.792 14.871,53.378 14.858,53.391 13.438,53.391 13.438,53.353 13.436,53.351 13.243,53.351
NetL1_1 on Top Layer "NETL1_1_L01_P099" (solid, remove dead copper, pour order 99): 18 vertices, not listed, extent 14.688,48.862 18.574,50.945
VCC4V0_SYS on Top Layer "VCC4V0_SYS_L01_P096" (solid, remove dead copper, pour order 96): 19 vertices, not listed, extent 13.591,52.586 16.753,55.098
GND on Layer 2 (split plane): 17 vertices, not listed, extent -1.489,-1.489 -0.475,-0.476
GND on Layer 2 (split plane): 17 vertices, not listed, extent -1.489,68.476 -0.474,69.49
GND on Layer 2 (split plane): 256 vertices, not listed, extent -1.489,-1.489 74.49,69.49
GND on Layer 2 (split plane): 17 vertices, not listed, extent 73.475,-1.489 74.49,-0.473
VCC4V0_SYS on Layer 2 (split plane): 71 vertices, not listed, extent -0.695,-0.136 24.804,57.342
GND on Layer 2 (split plane): 74.49,68.473 74.481,68.502 74.402,68.693 74.369,68.754 74.355,68.781 74.24,68.953 74.177,69.03 74.03,69.177 73.953,69.24 73.781,69.355 73.693,69.402 73.502,69.481 73.474,69.49 74.49,69.49
GND on Layer 1 (split plane): 17 vertices, not listed, extent -1.489,-1.489 -0.475,-0.476
GND on Layer 1 (split plane): 17 vertices, not listed, extent -1.489,68.476 -0.474,69.49
GND on Layer 1 (split plane): 248 vertices, not listed, extent -1.489,-1.489 74.49,69.49
GND on Layer 1 (split plane): 74.49,68.473 74.481,68.502 74.402,68.693 74.369,68.754 74.355,68.781 74.24,68.953 74.177,69.03 74.03,69.177 73.953,69.24 73.781,69.355 73.693,69.402 73.502,69.481 73.474,69.49 74.49,69.49
GND on Layer 1 (split plane): 17 vertices, not listed, extent 73.475,-1.489 74.49,-0.473

## Other copper
Top Layer:
  pour cut-out: 2.745,61.611 5.984,61.611 6.159,61.435 6.159,60.686 6.118,60.686 4.396,58.964 4.396,57.778 3.634,57.016 1.92,57.016 1.008,56.104 1.008,54.293 0.687,54.293 0.662,54.268 -0.709,55.639 -0.798,55.639 -0.798,59.581 1.221,61.6 1.434,61.6
  pour cut-out: 5.204,29.708 5.234,29.708 5.844,29.099 5.844,23.269 5.323,22.749 5.328,22.744 5.328,21.352 5.511,21.352 6.438,22.279 6.438,28.519 8.071,30.153 7.518,30.706 5.257,30.706
  pour cut-out: 56.126,59.507 56.161,59.543 57.802,59.543 67.325,50.021 67.97,50.021 67.97,49.982 69.298,48.654 69.298,47.836 69.509,47.836 72.689,44.656 72.689,43.003 72.679,43.003 69.405,39.728 69.405,36.391 67.342,34.328 67.342,33.754 67.352,33.754 72.971,28.136 72.961,28.126 72.961,21.265 70.324,18.629 68.203,18.629 65.084,15.51 65.135,15.459 65.135,14.882 65.105,14.882 59.821,9.599 59.821,8.956 51.912,8.956 47.192,13.676 47.192,20.214 59.308,32.329 59.308,34.857 57.378,34.857 46.029,46.205 46.029,49.452
  pour cut-out: 50.942,65.878 52.76,67.696 58.526,67.696 59.278,66.945 59.278,60.181 51.729,60.181 51,60.91
  pour cut-out: 32.859,52.533 27.419,57.973 27.419,65.957 28.485,67.023 28.658,66.851 32.504,66.851 33.075,66.279 40.809,66.279 41.726,67.196 42.339,67.196 42.339,66.678 43.405,65.611 43.405,52.545
  pour cut-out: 19.501,42.035 19.501,41.065 19.545,41.021 21.49,41.021 21.49,42.091 21.513,42.114
  pour cut-out: 17.629,48.402 17.629,46.708 17.706,46.632 18.391,46.632 18.391,46.637 18.43,46.675 18.43,48.493
  pour cut-out: 21.719,56.038 21.719,54.641 21.5,54.422 21.579,54.344 21.579,54.029 22.257,54.029 22.252,54.034 22.252,56.244
  pour cut-out: 18.775,57.049 18.8,57.023 18.8,56.317 18.836,56.317 18.963,56.444 18.971,56.437 19.943,56.437 19.943,56.426 20.096,56.274 20.096,55.484 20.136,55.484 20.23,55.39 20.238,55.398 21.495,55.398 21.546,55.449 21.528,55.466 21.528,56.937
  pour cut-out: 1.887,52.406 1.887,52.37 0.964,51.448 1.236,51.176 1.236,51.103 1.33,51.103 2.161,51.933
  pour cut-out: 6.857,43.437 8.137,44.717 8.32,44.717 8.32,44.499 8.254,44.433 8.254,43.564 7.8,43.109 7.076,43.109 7.076,42.032 7.139,41.969 8.696,41.969 8.767,41.898 8.767,41.674 8.711,41.674 8.661,41.623 6.862,41.623
  pour cut-out: 8.249,16.579 8.181,16.51 8.181,14.814 7.739,14.372 7.739,13.376 7.02,13.376 6.779,13.135 6.779,10.193 6.565,9.98 6.613,9.932 6.613,9.274 7.076,8.812 6.979,8.715 6.979,8.184 6.951,8.184 6.177,8.959 5.122,8.959 5.122,8.456 4.935,8.268 4.922,8.281 4.48,8.281 4.48,8.309 3.319,9.469 2.001,9.469 2.001,9.751 1.732,10.021 1.732,13.163 2.953,13.163 4.01,12.106 4.231,12.106 5.653,13.528 5.653,15.573 5.717,15.573 6.89,16.747
  pour cut-out: 35.623,26.508 35.638,26.508 36.626,25.52 36.626,23.823 36.26,23.823 33.728,21.291 33.728,10.95 32.166,10.95 31.701,10.485 31.701,10.038 31.495,9.833 31.384,9.833 31.384,1.248 30.355,0.219 23.497,0.219 23.238,0.478 23.149,0.389 11.132,0.389 11.132,1.898 11.472,2.238 11.597,2.238 12.6,1.235 12.643,1.278 21.861,1.278 21.861,6.668 24.274,9.081 24.256,9.099 24.256,15.276 24.327,15.276 25.709,16.658 25.674,16.693 25.674,20.999 25.895,20.999 30.589,25.692
  pour cut-out: 63.824,29.535 70.985,22.375 70.987,22.375 60.268,11.656 53.106,18.819
  pour cut-out: 51.734,50.211 51.737,50.211 62.425,39.523 69.585,46.683 69.588,46.683 69.588,46.691 58.884,57.394
  pour cut-out: 7.363,21.895 7.365,21.893 20.426,21.893 20.426,33.599 20.418,33.607 7.363,33.607
  pour cut-out: 42.125,50.089 42.133,50.089 58.389,33.833 42.132,17.576 25.874,33.833
  pour cut-out: 60.797,49.983 60.54,49.726 60.54,49.17 60.228,49.17 60.118,49.28 59.934,49.097 59.79,49.097 59.486,49.4 59.486,49.546 59.072,49.96 59.073,49.961 59.073,50.272 59.342,50.272 59.83,49.784 60.244,49.784 60.384,49.924 60.384,50.032
  pour cut-out: 59.068,47.68 59.31,47.68 60.551,48.922 60.551,49.541 59.868,48.857 59.705,48.857 59.276,49.286 58.71,48.72 58.644,48.72 58.644,48.218
  pour cut-out: 54.798,27.141 54.83,27.141 54.892,27.203 54.866,27.229 54.035,27.229 54.035,26.567 54.493,26.109 55.155,26.109 55.214,26.051
  pour cut-out: 62.834,22.705 62.411,22.705 61.61,21.904 61.61,21.811 62.807,20.613 62.849,20.655 62.942,20.655 62.942,20.747 62.983,20.789 62.647,21.125 62.647,21.575 63.341,22.268
  pour cut-out: 58.313,22.553 58.902,23.142 58.902,23.152 57.66,24.394 57.004,24.394 56.492,23.882 56.193,23.882 55.922,24.154 55.568,24.154 55.568,23.572 55.849,23.291 55.849,23.239 57.153,23.239 57.776,22.616 57.776,22.56
Layer 4:
  pour cut-out: 40.004,41.966 41.559,40.412 41.559,39.81 41.267,39.518 41.32,39.465 41.32,39.056 42.885,37.491 43.216,37.491 43.832,36.875 44.124,36.875 44.423,36.576 44.683,36.836 45.479,36.836 46.443,37.8 46.443,39.106 46.184,39.106 45.344,39.947 43.324,41.966
  pour cut-out: 57.749,59.35 69.07,48.029 69.222,48.029 69.222,42.587 61.052,34.417 50.83,34.417 50.83,34.736 51.236,35.142 51.323,35.142 51.323,35.181 49.398,37.107 49.228,36.937 47.714,36.937 45.799,38.852 46.72,39.773 46.72,40.079 44.014,42.785 44.014,46.913 56.458,59.358 56.649,59.358
  pour cut-out: 17.269,37.978 17.236,37.978 16.624,37.366 16.624,34.885 18.226,34.885 19.466,36.124 19.466,37.862
  pour cut-out: 9.75,0.097 9.664,0.097 7.292,-2.275 2.433,-2.275 2.433,-0.574 1.62,0.239 1.691,0.31 9.451,0.31
  pour cut-out: 74.868,6.523 68.757,0.412 68.757,-2.212 74.678,-2.212 75.259,-1.63 75.259,6.548
  pour cut-out: 35.597,32.164 35.597,32.088 37.403,30.282 37.403,30.11 36.969,29.675 33.545,29.675 33.545,31.08 32.753,31.872 33.075,32.195 33.53,32.195 33.756,31.969 33.779,31.992 35.163,31.992 35.47,32.299
  pour cut-out: 11.96,21.065 12.138,21.065 13.756,19.447 13.794,19.485 16.563,19.485 16.563,20.689 15.859,21.392 15.806,21.339 11.968,21.339
  pour cut-out: 24.543,37.13 25.643,37.13 27.365,35.408 27.228,35.271 27.228,35.212 23.863,35.212 23.54,34.89 23.54,31.575 23.39,31.425 21.884,32.931 21.884,35.164 21.823,35.225 23.819,37.222 24.018,37.222
  pour cut-out: 12.389,33.587 16.192,33.587 16.192,33.853 16.933,34.595 17.802,34.595 17.802,32.563 18.727,31.639 18.727,27.163 17.035,25.471 12.89,25.471 10.87,27.491 10.921,27.542 10.921,32.304
  pour cut-out: 20.868,46.569 20.868,42.368 20.355,41.854 19.669,41.854 19.669,41.669 19.143,41.143 19.143,40.188 19.179,40.188 21.053,38.314 21.053,37.323 22.836,37.323 23.09,37.577 22.836,37.831 22.836,46.493 21.714,46.493 21.18,47.026
  pour cut-out: 19.473,51.623 21.503,49.594 22.367,49.594 22.367,51.715 22.252,51.829 22.252,54.44 21.833,54.44 20.078,56.195 19.473,56.195
  pour cut-out: 5.171,60.77 4.541,60.14 6.441,60.14 7.18,60.879 7.091,60.968 7.091,61.842 7.104,61.842 7.779,62.517 12.262,62.517 12.262,61.872 12.915,61.219 23.451,61.219 23.451,60.851 25.671,58.631 25.887,58.847 25.887,62.167 33.334,62.167 38.419,57.082 38.419,54.882 39.613,54.882 39.74,54.755 44.861,59.876 52.811,59.876 53.87,60.935 53.636,61.169 39.981,61.169 39.225,61.926 39.255,61.956 39.255,62.84 13.184,62.84 12.9,63.124 7.241,63.124 6.103,61.987 6.116,61.974 6.116,61.285 5.567,60.737 5.531,60.772 5.001,60.772
  pour cut-out: -1.398,3.366 -1.398,53.792 -1.388,53.803 -1.41,53.825 -2.322,53.825 -2.322,3.391 -2.271,3.34
  pour cut-out: 9.694,16.495 11.335,14.854 11.335,12.261 16.563,12.261 16.715,12.413 16.715,15.35 14.965,17.1 9.667,17.1
  pour cut-out: 39.288,23.836 39.349,23.775 39.349,19.472 46.557,12.263 46.603,12.309 51.897,12.309 51.897,16.31 43.957,24.25 43.957,25.878 43.39,26.444 41.716,26.444 41.716,26.409 41.246,25.939 40.964,26.221 40.51,26.221 39.288,24.999
  pour cut-out: 52.234,34.27 47.251,29.287 47.251,27.422 46.215,26.386 44.393,26.386 44.393,26.33 44.084,26.02 44.084,23.805 49.09,18.799 49.011,18.72 49.011,15.118 54.34,9.79 54.398,9.848 59.458,9.848 68.963,19.353 68.963,26.76 61.729,33.994
  pour cut-out: 44.231,38.311 44.231,37.752 44.355,37.628 46.367,37.628 46.367,37.448 47.655,36.16 48.089,36.594 48.127,36.594 48.127,36.617 48.447,36.937 48.247,37.138 48.247,37.613 48.879,38.245 48.879,38.606 48.412,38.606 48.211,38.806 48.181,38.776 46.86,38.776 46.86,38.697 46.481,38.319
  pour cut-out: 40.644,49.965 42.359,49.965 45.529,46.795 45.61,46.795 45.61,44.643 46.309,43.945 46.309,43.297 46.049,43.038 43.995,43.038 42.951,41.994 40.637,41.994 40.637,42.601 38.882,44.356 33.954,44.356 33.954,45.748 36.268,48.062 38.798,48.062
  pour cut-out: 17.256,50.836 17.853,50.836 17.853,51.382 17.279,51.382 17.259,51.362
Bottom Layer:
  pour cut-out: 42.133,50.092 58.389,33.836 58.389,33.826 42.135,17.572 28.973,30.734 28.973,36.904
  pour cut-out: 20.965,45.951 21.03,45.886 21.03,45.253 19.245,45.253 19.057,45.065 19.057,44.175 18.732,44.175 18.514,43.957 18.157,44.314 18.157,45.469 18.371,45.683 19.003,45.683 19.003,45.938
  pour cut-out: 2.593,46.348 2.829,46.584 3.212,46.2 4.279,46.2 4.756,45.723 5.528,45.723 5.528,44.354 3.793,42.619 3.172,42.619 2.593,43.198
  pour cut-out: 65.239,13.633 62.332,10.725 62.332,5.099 62.271,5.037 62.347,4.961 65.226,4.961 65.226,5.232 65.585,5.591 65.552,5.624 65.552,13.805
  pour cut-out: 71.373,36.15 70.769,35.545 70.769,33.859 70.636,33.726 69.127,33.726 68.6,34.254 68.6,34.999 68.97,34.999 70.141,36.17
  pour cut-out: 3.438,69.355 28.475,69.355 29.042,68.788 29.128,68.874 29.128,70.722 3.738,70.722 3.377,70.361
  pour cut-out: 23.977,10.701 27.782,14.506 40.012,14.506 46.481,8.037 46.431,7.986 46.431,4.843 36.945,4.843 33.679,1.577 33.679,-0.155 27.925,-0.155 23.992,3.778 23.992,8.4
  pour cut-out: 56.9,67.93 57.733,67.93 57.914,67.75 57.914,62.144 57.558,61.788 57.502,61.844 56.867,61.844
  pour cut-out: 51.952,57.58 44.492,50.12 44.492,47.102 45,47.102 47.078,49.18 46.803,49.455 46.803,51.639 47.353,51.639 53.682,57.968 53.682,61.926 53.507,62.101 53.324,61.918 52.431,61.918
  pour cut-out: 28.384,62.009 28.242,61.867 21.495,61.867 21.495,61.021 31.61,50.907 36.331,50.907 41.084,55.659 41.084,61.405 39.407,61.405 34.734,66.078 34.734,67.745 28.394,67.745 28.297,67.841
  pour cut-out: 2.115,68.24 2.115,62.301 2.849,61.567 3.2,61.918 4.132,61.918 4.132,68.869 3.646,69.355 3.23,69.355
  pour cut-out: -1.352,37.747 -1.192,37.587 -1.192,35.654 -0.775,35.654 -0.697,35.733 -0.674,35.71 3.616,35.71 5.112,37.206 3.202,39.116 -0.272,39.116
  pour cut-out: -1.134,6.734 -1.134,5.819 -0.458,5.144 1.262,5.144 1.262,4.803 2.166,3.899 2.143,3.876 2.143,2.553 2.237,2.553 3.037,1.753 3.037,0.107 3.184,0.107 3.959,-0.668 4.015,-0.612 7.251,-0.612 7.251,-0.437 7.929,0.242 7.929,6.546 -0.933,6.546 -1.009,6.47
  pour cut-out: 14.444,21.341 14.338,21.235 11.627,21.235 11.627,21.199 11.099,20.671 11.206,20.564 11.206,7.443 9.758,5.995 9.758,5.466 21.65,5.466 22.219,6.035 22.184,6.071 22.184,9.543 20.683,11.044 21.069,11.43 21.069,25.456 20.119,25.456 18.023,23.361 18.023,21.504
  pour cut-out: 43.088,14.387 42.897,14.196 32.471,14.196 31.963,13.688 31.963,11.054 31.391,11.054 31.264,10.927 31.03,11.161 28.219,11.161 28.219,18.766 27.637,19.348 27.731,19.442 27.731,23.071 27.924,23.071 30.756,25.903 36.014,25.903 43.713,18.205
  pour cut-out: 12.971,32.19 17.355,32.19 18.229,31.316 18.071,31.159 18.071,24.344 17.121,24.344 15.206,22.429 14.983,22.652 10.959,22.652 10.959,30.115 11.8,30.955
  pour cut-out: 58.17,59.045 58.287,59.045 72.321,45.012 72.321,42.51 69.527,39.716 69.527,36.277 67.893,34.643 67.893,33.193 72.928,28.159 72.928,20.795 70.959,20.795 59.953,9.79 59.89,9.853 54.284,9.853 49.087,15.05 49.087,20.252 48.663,20.252 46.413,22.502 46.413,25.659 45.094,26.978 45.191,27.074 45.191,43.881 45.765,44.455 45.765,46.487 45.91,46.487 48.229,48.806 48.165,48.87 48.165,51.047 48.295,51.047 56.657,59.408 57.744,59.408
  pour cut-out: 32.806,61.788 57.558,61.788 57.608,61.838 57.608,67.79 32.829,67.79 32.816,67.803
  pour cut-out: 3.926,61.918 28.678,61.918 28.678,67.915 28.648,67.884 4.012,67.884
  pour cut-out: 32.816,5.842 57.558,5.842 57.561,5.84 57.561,-0.155 32.885,-0.155 32.796,-0.066
  pour cut-out: 3.926,5.967 3.929,5.964 3.929,-0.033 28.737,-0.033 28.676,0.028 28.676,5.964
Layer 2 (plane layer: these items are gaps in the copper):
  lines w0.127: -0.76,8.603 -0.76,13.094 -0.76,53.389 3.258,57.407 16.761,57.407 18.506,55.662 18.506,46.134 20.511,44.129 22.51,44.129 24.868,41.771 24.868,40.978 22.191,38.301 11.503,38.301 7.099,33.897 7.099,8.591 10.444,8.591 10.652,8.382 10.652,0.216 10.235,-0.2 -0.303,-0.2 -0.758,0.254 ; -0.75,0.27 -0.75,8.624
Multi-Layer:
  pour cut-out: 74.972,-2.004 74.988,-1.988 74.988,3.983 69.009,-1.996
  pour cut-out: -2.004,-1.972 -1.988,-1.987 3.983,-1.987 -1.996,3.992
  pour cut-out: 74.972,69.967 74.957,69.982 68.986,69.982 74.965,64.003
  pour cut-out: -1.992,70.003 -2.007,69.988 -2.007,64.016 3.972,69.995

## Silkscreen, mask and mechanical layers (free items; w line width, h text height)
Top Overlay:
  drawing of 98 lines, arcs and shapes, not listed
  text "VDD_LOGIC_S0" at 12.76,59.418 h0.25
  text "VDD_GPU_S0" at 18.743,56.938 h0.18
  text "VDDQ_DDR" at 4.079,56.905 h0.2
  text "VCC_1V8_S0" at 11.169,54.294 h0.15 r90
  text "VDDA_1V2_S0" at 11.868,54.299 h0.15 r90
  text "VCC_2V0_PLDO_S3" at 10.443,54.273 h0.15 r90
  text "VCC4V0_SYS" at 8.416,54.222 h0.15 r90
  text "VCCIO_SD_S0" at 8.026,54.201 h0.15 r90
  text "VCCA_3V3_S0" at 9.046,54.192 h0.15 r90
  text "AVDD1V8_DDR_PLL_S0" at 9.658,53.671 h0.13 r90
  text "download" at 69.791,53.521 h0.64
  text "LPDDR4X" at 53.141,52.766 h0.76 r45
  text "PMIC" at 16.01,52.13 h0.76 r270
  text "VDD_0V75_S0" at 5.511,49.749 h0.15
  text "VDD_DDR_S0" at 22.361,49.011 h0.18
  text "VCC_1V1_NLDO_S3" at 5.501,49.005 h0.13
  text "VCC_3V3_S3" at 0.821,48.418 h0.2 r90
  text "VDDA_0V85_S0" at 5.488,48.278 h0.15
  text "CPU SOC" at 37.916,48.079 h0.76 r45
  text "HDMI_VDDA0V85_S0" at 5.455,47.486 h0.13
  text "VDDA_DDR_PLL_S0" at 5.493,46.879 h0.13
  text "VCC_1V1_NLDO_S3" at 5.478,46.096 h0.15
  text "VDD_0V75_S3" at 5.529,45.365 h0.15
  text "VCC_1V8_S3_PLDO6" at 5.557,44.534 h0.15
  text "VCC1V8_PMU_DDR_S3" at 6.177,44.041 h0.18
  text "VDD_CPU_LIT_S0" at 22.42,43.907 h0.15 r270
  text "VDD_VDENC_S0" at 4.808,39.38 h0.18 r90
  text "VDD2_DDR_S3" at 11.366,38.136 h0.15
  text "VDD_CPU_BIG0_S0" at 6.442,37.62 h0.15 r270
  text "VCC_1V1_NLDO_S3" at 19.682,35.819 h0.25
  text "VCC_3V3_S0" at 7.868,35.794 h0.15 r90
  text "VDD_NPU_S0" at 18.33,34.686 h0.25
  text "EMMC" at 21.178,33.345 h0.76 r270
  text "VDD_CPU_BIG1_S0" at 5.13,30.084 h0.15 r270
  text "VDD_CPU_BIG1_MEM_S0" at 0.246,23.13 h0.15
  text "BOOT FLASH" at 18.787,20.756 h0.76 r270
  text "power" at 0.611,20.442 h0.38
  text "debug" at -0.493,18.004 h0.64
  text "LPDDR4X" at 53.798,15.977 h0.76 r315
  text "Rockchip RK3588" at 30.395,10.399 h1.52
  text "sys led" at 67.007,8.705 h0.38
  text "MASKROM" at 59.631,1.014 h0.38
  text "RECOVERY" at 62.819,0.999 h0.38
  text "RESET" at 66.664,0.96 h0.38
  text "POWER" at 69.946,0.94 h0.38
Bottom Overlay:
  lines w0.051: 3.929,-0.352 13.051,-0.352 ; 3.941,6.231 13.664,6.231 ; 6.873,68.197 12.712,68.197 ; 9.415,61.235 18.176,61.235 ; 13.446,68.197 19.184,68.197 ; 20.926,61.235 21.62,61.235 ; 21.386,-0.482 21.719,-0.482 ; 21.813,6.231 24.686,6.231 ; 22.377,-0.482 27.19,-0.482 ; 25.45,6.231 28.165,6.231 ; 26.359,68.197 28.178,68.197 ; 27.406,-0.482 27.701,-0.482 ; 32.803,6.231 57.017,6.231 ; 33.791,-0.482 37.083,-0.482 ; 34.688,68.197 36.613,68.197 ; 37.19,68.197 41.584,68.197 ; 37.764,-0.482 41.107,-0.482 ; 38.219,61.235 41.122,61.235 ; 40.693,25.761 40.827,25.896 40.827,25.901 ; 40.832,25.129 40.832,25.891 ; 40.832,25.896 40.832,25.893 40.975,25.751 ; 41.731,-0.482 47.579,-0.482 ; 41.79,61.235 45.097,61.235 ; 42.189,68.197 47.591,68.197 ; 45.425,31.486 45.43,31.486 ; 45.427,31.489 45.712,31.489 47.408,29.792 48.612,29.792 48.887,29.518 ; 45.43,31.476 45.43,31.486 ; 45.516,40.811 45.585,40.879 ; 45.524,40.808 45.524,40.811 ; 45.577,31.634 45.43,31.486 ; 45.582,31.334 45.43,31.486 ; 45.595,40.739 45.529,40.805 45.74,40.805 ; 45.75,61.235 49.56,61.235 ; 47.043,36.411 47.043,36.559 ; 47.17,36.414 47.045,36.414 48.003,37.371 48.01,37.371 ; 47.916,34.285 47.863,34.232 47.861,34.232 47.861,34.224 ; 47.924,34.161 47.861,34.224 ; 48.211,68.197 53.588,68.197 ; 48.254,34.224 47.861,34.224 ; 48.259,34.229 49.539,35.51 49.539,35.629 ; 48.302,-0.482 53.568,-0.482 ; 50.289,61.235 51.066,61.235 ; 51.701,61.235 52.725,61.235 ; 54.277,68.197 57.063,68.197 ; 54.279,-0.482 57.027,-0.482
  text "MIPI_DPHY0_RX" at 11.117,68.394 h0.25
  text "MIPI_DPHY0_TX" at 17.802,68.394 h0.25
  text "HDMI_TX1" at 45.534,68.394 h0.25
  text "HDMI_TX0" at 51.747,68.394 h0.25
  text "TYPEC0" at 27.913,68.352 h0.25
  text "TYPEC0" at 36.387,68.352 h0.25
  text "TYPEC1" at 40.025,68.352 h0.25
  text "SDMMC" at 56.22,68.352 h0.25
  text "GPIO" at 14.297,60.788 h0.25
  text "GPIO" at 21.673,60.788 h0.25
  text "SARADC" at 40.308,60.788 h0.25
  text "TYPEC0" at 44.105,60.788 h0.25
  text "TYPEC1" at 48.494,60.788 h0.25
  text "USB20_HOST1" at 51.272,60.784 h0.13
  text "USB20_HOST0" at 52.867,60.784 h0.13
  text "VCCIO_FLASH" at 12.428,32.522 h0.18
  text "VCC3V3_FLASH" at 16.446,30.949 h0.18
  text "POWER" at 8.993,6.472 h0.25
  text "GMAC0" at 23.847,6.472 h0.25
  text "GPIO" at 27.261,6.472 h0.25
  text "GPIO" at 45.498,6.472 h0.25
  text "PCIE20_PORT0" at 36.774,-1.037 h0.25
  text "PCIE20_PORT1" at 40.886,-1.037 h0.25
  text "PCIE30_PORT0" at 46.014,-1.037 h0.25
  text "PCIE30_PORT1" at 52.112,-1.037 h0.25
  text "POWER" at 9.006,-1.079 h0.25
  text "GMAC0" at 25.275,-1.079 h0.25
  text "GPIO" at 56.149,-1.079 h0.25
  text "GPIO" at 21.865,-1.105 h0.18
  text "GPIO" at 27.797,-1.105 h0.18
Mechanical 1:
  circle w0.254: c73,0 r1.05
  circle w0.254: c0,68 r1.05
  circle w0.254: c73,68 r1.05
  circle w0.254: c0,0 r1.05
  lines w0.254: -2,-2 75,-2 75,70 -2,70 -2,-2

## Text inside footprints (layer, text, board x,y; h text height)
JP1: Top Overlay "1" at 3.155,8.396 h0.25 r270